# Altium PCB BLE_product-v1.0.PcbDoc (part 2 of 2)
Units mm, origin at the board's own origin, x right, y up, seen from the top; angles counter-clockwise.
Board outline 12 x 12.89 mm, 4 copper layers (Top Layer, Layer 2, Layer 3, Bottom Layer), stack 0.999 mm thick; 45 components, 33 nets, 183 pads, 89 vias.
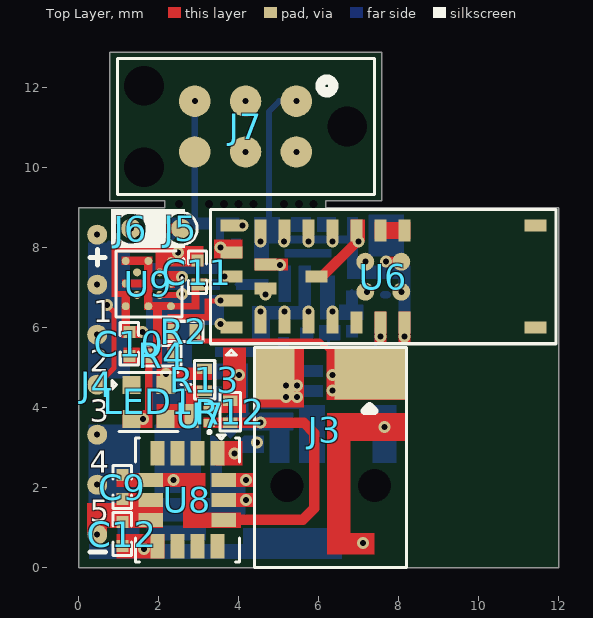
[diagram p0: Top Layer view]

## Other copper (continued)
Layer 3: (continued)
  rectangle net VBAT: 1.487,0.3 2.004,1.762
  rectangle net VBAT: 1.487,0.186 7.254,0.575
Bottom Layer:
  rectangle net VBAT: 0.242,1.154 1.532,3.581
  rectangle net 5V_USB: 4.556,3.957 5.807,4.068
  rectangle net NetQ1_3: 4.331,6.202 5.805,6.535
  rectangle net VBAT: 3.429,7.977 3.628,8.752
  rectangle net VBAT: 3.628,8.452 4.011,8.752
  rectangle net GND: 2.017,8.452 3.277,8.752
  rectangle net NetR3_1: 4.888,4.268 6.107,4.568
  rectangle net 3V: 6.701,7.211 8.284,7.555
  rectangle net 3V: 6.701,7.301 6.971,8.761
  rectangle net 3V: 4.684,8.095 6.971,8.298
  rectangle net SDA: 5.951,8.391 6.421,8.761
  region net SCL: 5.799,8.761 5.304,8.761 5.304,8.391 5.799,8.391
  rectangle net GND: 7.24,7.779 8.129,8.825
  rectangle net 3V: 7.984,5.769 8.284,7.301
  rectangle net GND: 6,5.671 6.541,6.066
  rectangle net GND: 6.508,6.187 7.113,6.579
  rectangle net NetC8_2: 6.671,5.753 6.971,6.06
  rectangle net GND: 0.253,0.212 4.654,0.591
  rectangle net VBAT: 7.342,2.61 7.942,4.068
  rectangle net GND: 3.916,3.424 5.37,3.875
  region net GND: 3.45,3.551 3.788,3.213 4.314,3.738 3.976,4.076
  rectangle net GND: 2.659,4.695 4.229,5.098
  rectangle net GND: 3.929,4.05 4.229,5.098
  rectangle net GND: 1.673,3.825 2.823,6.815
  rectangle net GND: 2.031,6.068 3.631,6.812
  rectangle net BAT_STAT: 5.526,5.558 5.869,6.004
  rectangle net GND: 6.671,6.538 6.971,6.922
  rectangle net BAT_ADC: 6.025,6.196 6.397,6.818
  rectangle net GND: 4.106,0.212 6.582,0.989
  rectangle net GND: 2.823,6.069 3.632,6.812
  rectangle net ENABLE: 0.964,0.671 1.52,1.044
  rectangle net NetL1_1: 1.684,0.671 3.181,1.044
  rectangle net NetL1_1: 1.811,0.754 2.211,0.972
  rectangle net 5V: 1.888,1.154 4.166,1.735
  rectangle net 5V: 1.684,1.154 2.338,1.735
  rectangle net 5V: 1.811,1.154 2.211,1.372
  rectangle net NetQ1_1: 4.976,5.268 5.246,5.768
  rectangle net NetQ1_3: 5.494,6.406 5.805,6.818
  rectangle net NetQ1_3: 5.494,6.633 5.805,7.555
  rectangle net NetSW1_2: 0.881,6.938 3.528,7.218
  rectangle net 3V: 4.371,7.493 4.754,8.761
  rectangle net VBAT: 4.985,6.633 5.296,7.555
  rectangle net 5V_USB: 5.507,2.61 6.158,4.068
  rectangle net 5V_USB: 4.384,3.957 4.705,5.052
  rectangle net NetL1_1: 1.888,1.861 3.056,3.581
  rectangle net 3V: 4.371,8.131 5.024,8.761
  rectangle net NetR5_1: 4.985,4.768 6.107,5.068
  rectangle net GND: 4.761,2.61 5.258,3.875
  rectangle net BAT_ADC: 6.027,6.633 6.397,7.304
  rectangle net V_MON: 5.145,7.754 6.312,7.964
  rectangle net NetQ1_3: 4.331,5.668 4.781,6.535
  rectangle net NetQ1_1: 3.406,5.268 5.246,5.518
  rectangle net ENABLE: 3.788,7.878 4.068,8.225
  rectangle net CLR_POWER: 3.928,6.938 4.741,7.218
  rectangle net ENABLE: 4.129,2.865 4.631,3.295
  rectangle net 3V: 3.277,3.935 3.579,4.525
  rectangle net 5V: 3.277,2.23 3.579,3.08
  rectangle net 5V: 3.277,1.423 4.166,2.23
  rectangle net VBAT: 0.56,1.154 1.411,1.372
  rectangle net VBAT: 0.238,1.154 0.877,2.099
  rectangle net NetSW1_2: 0.223,4.724 1.273,8.125
  rectangle net GND: 1.673,7.338 3.528,7.618

## Silkscreen, mask and mechanical layers (free items; w line width, h text height)
Top Overlay:
  region: 2.53,8.959 2.651,8.959 2.651,8.891 2.635,8.876 2.631,8.88 2.517,8.88 2.517,8.896 ccw(c2.395,8.896) 2.505,8.949 cw(c2.529,8.924)
  region: 2.437,7.99 2.651,7.99 2.651,8.002 2.651,8.082 cw(c2.59,8.229) 2.529,8.082 2.433,8.082 2.433,8.091 cw(c2.433,8.275) 2.302,8.145 2.26,8.187 cw(c2.541,8.467) 2.144,8.467 2.144,8.471 cw(c2.439,8.471) 2.231,8.68 2.399,8.848 2.572,8.856 ccw(c2.381,8.885) 2.56,8.958 2.016,8.958 1.976,7.99 2.037,7.99
  region: 1.412,8.958 0.807,8.958 0.807,7.988 2.037,7.988 2.017,8.471 1.707,8.471 1.707,8.47 cw(c1.304,8.47) 1.589,8.185 1.588,8.184 cw(c1.301,8.471) 1.301,8.065 1.276,8.065 cw(c1.276,8.409) 1.033,8.166 0.929,8.27 0.892,8.612 ccw(c0.894,8.654) 0.937,8.653 1.019,8.735 ccw(c0.972,8.782) 0.957,8.846
  region: 2.033,8.958 cw(c1.38,8.736) 2.017,8.471 1.708,8.471 1.707,8.47 1.707,8.492 ccw(c1.352,8.492) 1.603,8.743 1.532,8.814 ccw(c1.485,8.768) 1.485,8.833 ccw(c1.517,8.872) 1.522,8.822 ccw(c1.274,8.326) 1.098,8.852 1.041,8.795 1.013,8.822 ccw(c0.957,8.766) 0.957,8.846 cw(c0.957,8.923) 0.902,8.868 0.812,8.958
  lines w0.076: 0.833,4.67 0.833,4.467 0.937,4.571 0.833,4.675 ; 2.551,4.58 2.805,4.58 ; 2.678,4.453 2.678,4.707 ; 3.658,3.313 3.455,3.313 3.559,3.208 3.664,3.313 ; 4.394,5.498 4.394,0 8.194,0 8.194,5.498 ; 3.682,5.31 3.81,5.436 3.936,5.31 3.682,5.31
  lines w0.127: 0.273,7.749 0.654,7.749 ; 0.28,0.392 0.661,0.392 ; 0.462,7.562 0.462,7.943
  text "1" at 0.36,6.137 h0.56
  text "2" at 0.266,4.89 h0.56
  text "3" at 0.266,3.643 h0.56
  text "4" at 0.266,2.371 h0.56
  text "5" at 0.266,1.149 h0.56
Bottom Overlay:
  lines w0.076: 4.709,0.609 4.963,0.609 ; 7.679,0.609 7.933,0.609 ; 7.806,0.482 7.806,0.736 ; 8.395,6.718 8.725,6.718 ; 8.56,6.553 8.56,6.883 ; 5.429,3.802 5.554,3.928 5.429,4.056 5.429,3.802
  text "BAT" at 6.944,1.118 h0.51
Dimensions:
  drawing of 295 lines, arcs and shapes, not listed
  text "Layer" at -36.77,52.705 h1.52
  text "Name" at -26.359,52.705 h1.52
  text "Material" at -2.743,52.705 h1.52
  text "Thickness" at 19.095,52.705 h1.52
  text "Constant" at 35.601,52.705 h1.52
  text "Board Layer Stack" at 50.075,52.705 h1.52
  text "Top Overlay" at -26.359,49.657 h1.52
  text "Top Solder" at -26.359,46.609 h1.52
  text "Solder Resist" at -2.743,46.609 h1.52
  text "0.010mm" at 19.095,46.609 h1.52
  text "3.5" at 35.601,46.609 h1.52
  text "1" at -36.77,43.561 h1.52
  text "Top Layer" at -26.359,43.561 h1.52
  text "0.035mm" at 19.095,43.561 h1.52
  text "Dielectric 2" at -26.359,40.513 h1.52
  text "PP-017" at -2.743,40.513 h1.52
  text "0.130mm" at 19.095,40.513 h1.52
  text "4.3" at 35.601,40.513 h1.52
  text "2" at -36.77,37.465 h1.52
  text "Layer 2" at -26.359,37.465 h1.52
  text "CF-004" at -2.743,37.465 h1.52
  text "0.035mm" at 19.095,37.465 h1.52
  text "Dielectric 1" at -26.359,34.417 h1.52
  text "FR-4" at -2.743,34.417 h1.52
  text "0.600mm" at 19.095,34.417 h1.52
  text "4.8" at 35.601,34.417 h1.52
  text "3" at -36.77,31.369 h1.52
  text "Layer 3" at -26.359,31.369 h1.52
  text "CF-004" at -2.743,31.369 h1.52
  text "0.035mm" at 19.095,31.369 h1.52
  text "Dielectric 3" at -26.359,28.321 h1.52
  text "PP-017" at -2.743,28.321 h1.52
  text "0.130mm" at 19.095,28.321 h1.52
  text "4.3" at 35.601,28.321 h1.52
  text "4" at -36.77,25.273 h1.52
  text "Bottom Layer" at -26.359,25.273 h1.52
  text "0.035mm" at 19.095,25.273 h1.52
  text "Bottom Solder" at -26.359,22.225 h1.52
  text "Solder Resist" at -2.743,22.225 h1.52
  text "0.010mm" at 19.095,22.225 h1.52
  text "3.5" at 35.601,22.225 h1.52
  text "Bottom Overlay" at -26.359,19.177 h1.52
  text "Total board thickness:" at -36.77,16.129 h1.52
  text "1.019mm" at 19.095,16.129 h1.52
Board Outline:
  lines w0.076: 0,9 2.146,9 2.146,9.169 0.77,9.169 0.77,12.886 7.576,12.886 7.576,9.167 6.166,9.167 6.166,9 7.501,9 12,9 ; 0,9 0,0 12,0 ; 0,9 0,9 ; 12,0 12,9 ; 12,0 12,0 ; 12,9 12,9

## Dimensions
12,9 to 7.576,12.886 on Dimensions
12,0 to 8.448,-2.002 on Dimensions
8.194,0 to 7.576,12.886 on Dimensions
12,9 to 8.448,-2.002 on Dimensions
12,9 to 8.4,9 on Dimensions
0,9 to 0,0 on Dimensions
0,9 to 12,9 on Dimensions

## Text inside footprints (layer, text, board x,y; h text height)
SW1: Bottom Overlay "PCB EDGE" at 1.241,7.62 h0.38 r90